# Altium PCB InterfaceBoard_MPCB.PcbDoc (part 2 of 3)
Units mil, origin at the board's own origin, x right, y up, seen from the top; angles counter-clockwise.
Board outline 1629.92 x 1653.54 mil, 4 copper layers (Top Layer, Power, Ground, Bottom Layer), stack 61.899 mil thick; 94 components, 58 nets, 296 pads, 186 vias.
Unrouted connection lines stored in the file: 1.
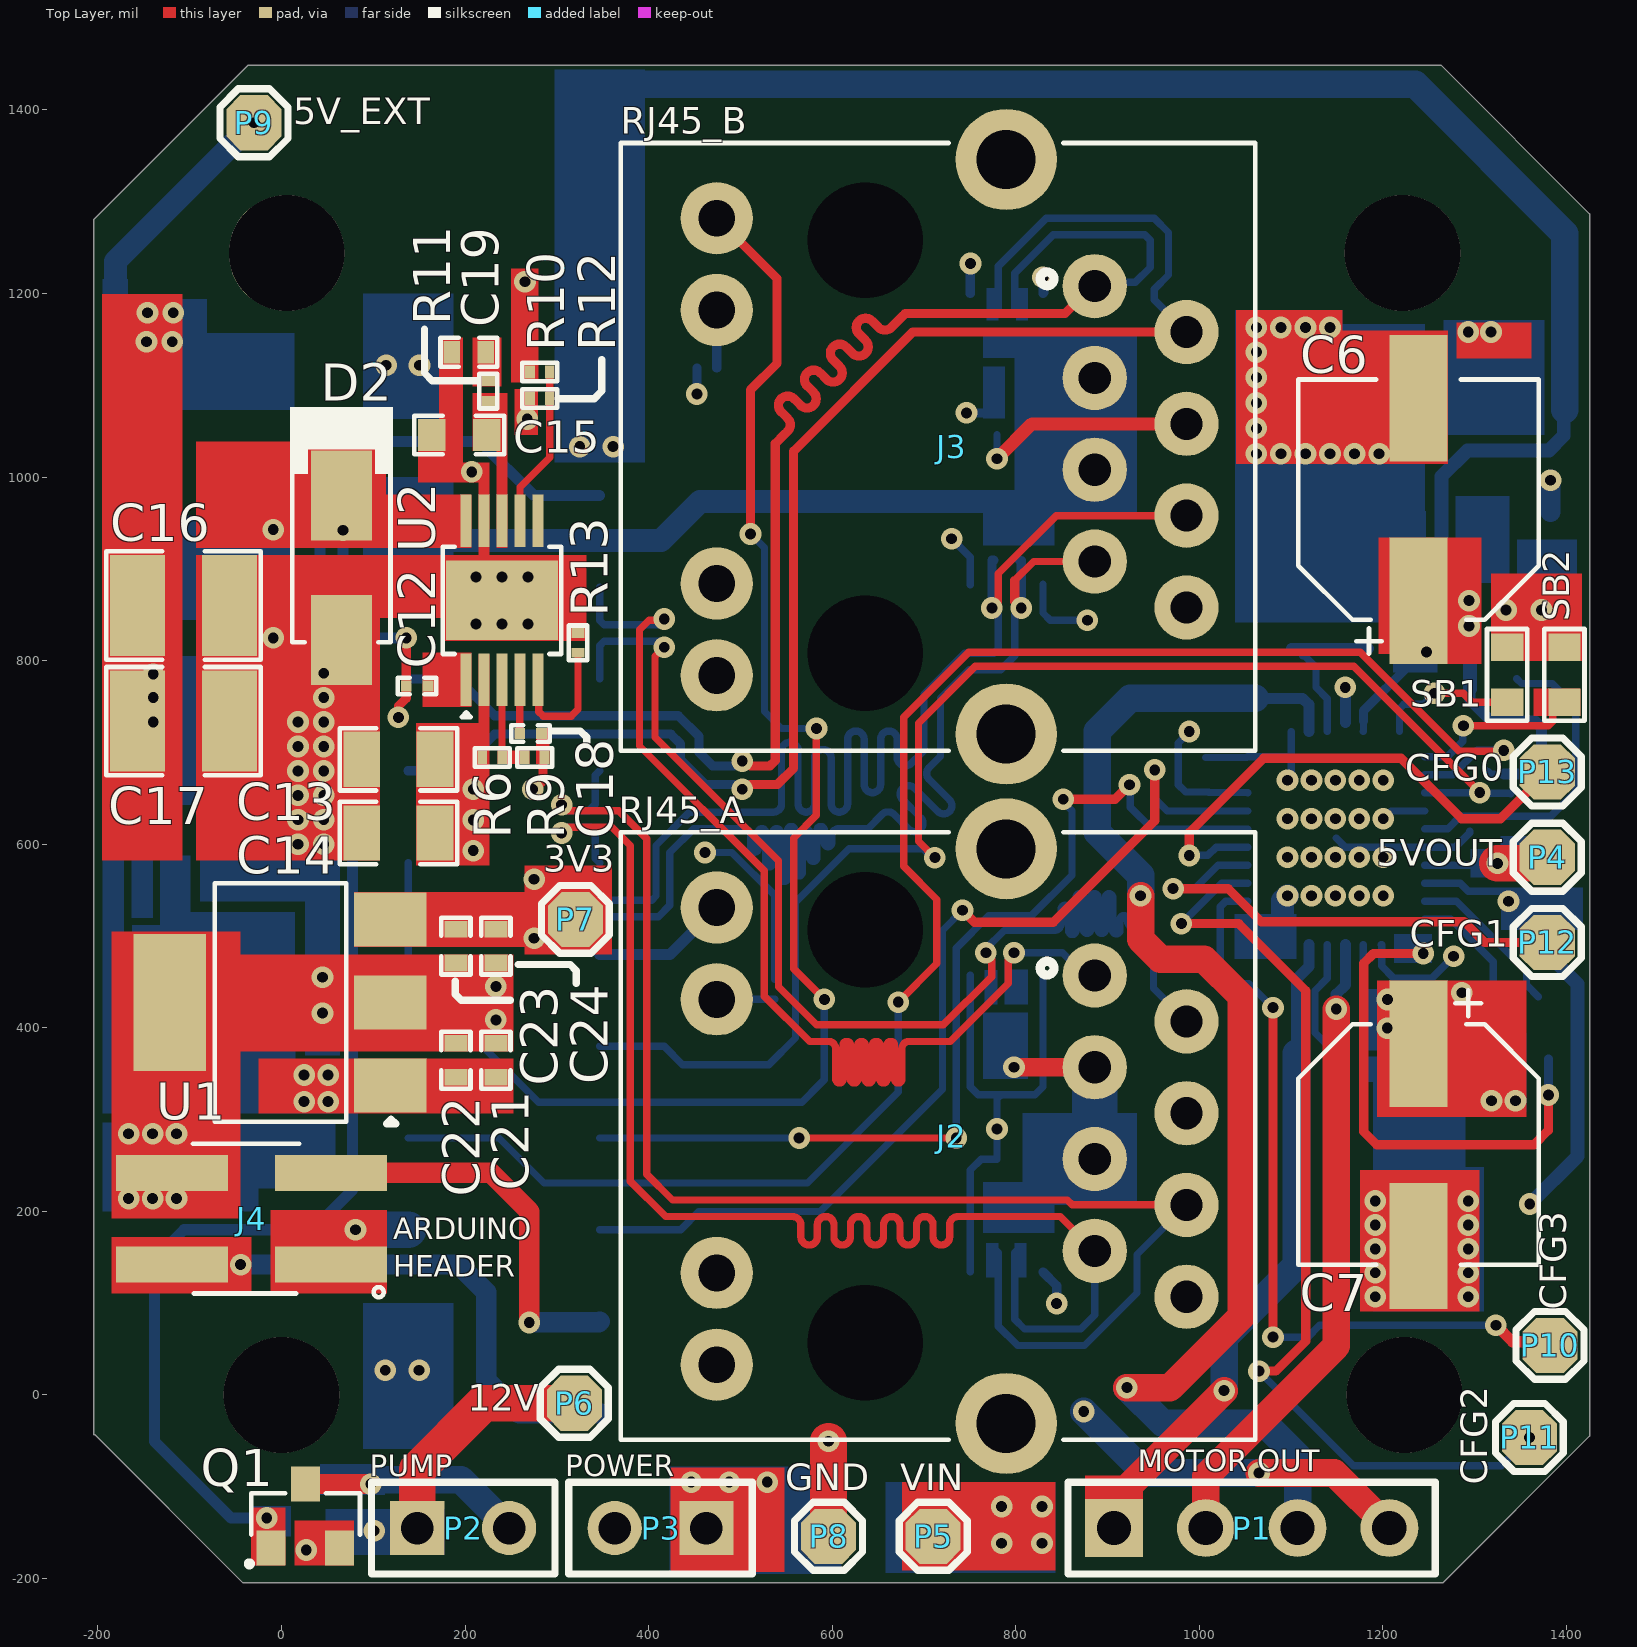
[diagram p0: Top Layer view]

## Part data (continued)
R7: library part RT0603BRD0720KL, "RES SMD 20K OHM 0.1% 1/10W 0603", Case Code (Imperial)=0603, Case Code (Metric)=1608, LCSC Part Number=C723637, Manufacturer=Yageo, Max Operating Temperature=125°C, Max Power Dissipation=100mW, Min Operating Temperature=-55°C, Package Quantity=5000, Resistance=20kR, Resistor Type="Thin Film", Temperature Coefficient=25ppm/°C, Tolerance=0.1%, Voltage Rating=75V, Voltage Rating (DC)=50V, Case/Package=0603, Category="Chip SMD Resistors", ComponentLink1Description=https://datasheet.ciiva.com/2585/pyu-rt-1-to-0-05-rohs-l-4-2585771.pdf?src-supplier=Digi-Key, ComponentLink1URL=https://datasheet.ciiva.com/2585/pyu-rt-1-to-0-05-rohs-l-4-2585771.pdf?src-supplier=Digi-Key, ComponentLink2Description=https://datasheet.ciiva.com/46634/pyu-rt-1-to-0-05-rohs-l-5-46634970.pdf?src-supplier=Digi-Key, ComponentLink2URL=https://datasheet.ciiva.com/46634/pyu-rt-1-to-0-05-rohs-l-5-46634970.pdf?src-supplier=Digi-Key, Construction=Rectangular, Contact Plating=Tin,Lead, Depth=0.8mm, Features="Moisture Resistant", Height=0.022inch, Item Type=Resistor, Lead Free="Lead Free", Length=1.6mm, Manufacturer Part Number=RT0603BRD0720KL, Military Standard=Not, Number of Terminations=2, Packaging="Tape and Reel", Power Rating=100mW, Pricing 1="5000=0.04300, 10000=0.03130, 25000=0.02970, 50000=0.02940, 125000=0.02040 (USD)", RoHS=Yes, RoHS Compliant=Yes, Series=RT, Size Code=0603, Stock 1=190000, Supplier 1="Arrow Electronics", Supplier Part Number 1=RT0603BRD0720KL, Termination=SMD/SMT, Weight=7.1E-05oz, Width=0.8mm
R8: library part VG039NCHXTB203, "±25% 20kΩ SMD Variable Resistors/Potentiometers ROHS", LCSC Part Number=C128550, Manufacturer="HDK(Hokuriku Elec Industry)", Package=SMD, ComponentLink1Description=LCSC, ComponentLink1URL=https://www.lcsc.com/product-detail/Variable-Resistors-Potentiometers_HDK-Hokuriku-Elec-Industry-VG039NCHXTB203_C128550.html, Item Type=Potentiometer, Manufacturer Part Number=VG039NCHXTB203
R9: library part 0201WMF7871TEE, "50mW Thick Film Resistors ±1% 7.87kΩ 0201 Chip Resistor - Surface Mount ROHS", LCSC Part Number=C473937, Manufacturer="UNI-ROYAL(Uniroyal Elec)", Package=0201, ComponentLink1Description=LCSC, ComponentLink1URL=https://www.lcsc.com/product-detail/Chip-span-style-background-color-ff0-Resistor-span-Surface-Mount_UNI-ROYAL-Uniroyal-Elec-0201WMF7871TEE_C473937.html, Item Type=Resistor, Manufacturer Part Number=0201WMF7871TEE
R10: library part WR02X1403FAL, "Res 140K Ohm 1% 1/20W 0201", LCSC Part Number=C367500, Manufacturer="Walsin Technologies", Supplier Part Number 1=1292-WR02X1403FALTR-ND, Category="Chip SMD Resistors", Item Type=Resistor, Manufacturer Part Number=WR02X1403FAL, Pricing 1="15000=0.00192 (USD)", RoHS=Yes, RoHS Compliant=Yes, Supplier 1=Digi-Key
R12 R22: library part RC0201JR-0710KL, "RES SMD 10K OHM 5% 1/20W 0201", Case Code (Imperial)=0201, Case Code (Metric)=0603, LCSC Part Number=C138117, Manufacturer=Yageo, Max Operating Temperature=125°C, Min Operating Temperature=-55°C, Power Rating=50mW, Resistance=10kR, Resistor Type="Thick Film", Supplier Part Number 1=311-10KNCT-ND, Temperature Coefficient=200ppm/°C, Tolerance=5%, Voltage Rating=25V, Case/Package=0201, Category="Chip SMD Resistors", ComponentLink1Description="New link", ComponentLink2Description=https://datasheet.ciiva.com/8891/pyu-rc0201-51-rohs-l-8-8891388.pdf?src-supplier=Avnet, ComponentLink2URL=https://datasheet.ciiva.com/8891/pyu-rc0201-51-rohs-l-8-8891388.pdf?src-supplier=Avnet, ComponentLink3Description=https://datasheet.ciiva.com/7672/1563626-7672253.pdf?src-supplier=Element14, ComponentLink3URL=https://datasheet.ciiva.com/7672/1563626-7672253.pdf?src-supplier=Element14, ComponentLink4Description=https://datasheet.ciiva.com/28405/pyu-rc0201-51-rohs-l-8-28405613.pdf?src-supplier=Avnet+Europe, ComponentLink4URL=https://datasheet.ciiva.com/28405/pyu-rc0201-51-rohs-l-8-28405613.pdf?src-supplier=Avnet+Europe, ComponentLink5Description=https://datasheet.ciiva.com/7672/1563626-7672254.pdf?src-supplier=Element14, ComponentLink5URL=https://datasheet.ciiva.com/7672/1563626-7672254.pdf?src-supplier=Element14, ComponentLink6Description=https://datasheet.ciiva.com/7660/1421516-7660810.pdf?src-supplier=Element14, ComponentLink6URL=https://datasheet.ciiva.com/7660/1421516-7660810.pdf?src-supplier=Element14, ComponentLink7Description=https://datasheet.ciiva.com/16856/pyu-rc0201-51-rohs-l-8-16856011.pdf?src-supplier=Avnet+Europe, ComponentLink7URL=https://datasheet.ciiva.com/16856/pyu-rc0201-51-rohs-l-8-16856011.pdf?src-supplier=Avnet+Europe, ComponentLink8Description=https://datasheet.ciiva.com/46391/1421516-46391291.pdf?src-supplier=Element14, ComponentLink8URL=https://datasheet.ciiva.com/46391/1421516-46391291.pdf?src-supplier=Element14, Contact Plating=Tin,Matte, Depth=0.3mm, Lead Free="Lead Free", Length=0.6mm, Manufacturer Part Number=RC0201JR-0710KL, Military Standard=Not, Packaging="Tape and Reel", Pricing 1="1=0.10000, 10=0.02600, 100=0.01050, 1000=0.00472, 2500=0.00410, 5000=0.00338 (USD)", Radiation Hardening=No, REACH SVHC=Unknown, RoHS=Yes, Stock 1=1488597, Supplier 1=Digi-Key, Termination=SMD/SMT, Voltage Rating (DC)=25V
R13: library part 0201WMF6813TEE, "50mW Thick Film Resistors ±1% 681kΩ 0201 Chip Resistor - Surface Mount ROHS", LCSC Part Number=C423447, Manufacturer="UNI-ROYAL(Uniroyal Elec)", Package=0201, ComponentLink1Description=LCSC, ComponentLink1URL=https://www.lcsc.com/product-detail/Chip-span-style-background-color-ff0-Resistor-span-Surface-Mount_UNI-ROYAL-Uniroyal-Elec-0201WMF6813TEE_C423447.html, Item Type=Resistor, Manufacturer Part Number=0201WMF6813TEE
R14 R15 R16 R17 R18 R19 R20 R21: library part RC0201FR-0749R9L, "RES SMD 49.9 OHM 1% 1/20W 0201", Case Code (Imperial)=0201, Case Code (Metric)=0603, LCSC Part Number=C155744, Manufacturer=Yageo, Max Operating Temperature=125°C, Max Power Dissipation=50mW, Min Operating Temperature=-55°C, Resistor Type="Thick Film", Temperature Coefficient=200ppm/°C, Tolerance=1%, Voltage Rating=25V, Case/Package=0201, Category="Chip SMD Resistors", ComponentLink1Description=http://www.yageo.com/documents/recent/PYu-RC0201_51_RoHS_L_(8).pdf?src-supplier=Mouser, ComponentLink1URL=http://www.yageo.com/documents/recent/PYu-RC0201_51_RoHS_L_(8).pdf?src-supplier=Mouser, ComponentLink2Description=http://www.yageo.com/documents/recent/PYu-RC0201_51_RoHS_L_(8).pdf?src-supplier=Future+Electronics, ComponentLink2URL=http://www.yageo.com/documents/recent/PYu-RC0201_51_RoHS_L_(8).pdf?src-supplier=Future+Electronics, ComponentLink3Description=http://www.yageo.com/documents/recent/PYu-RC_Group_51_RoHS_L_10.pdf?src-supplier=Digi-Key, ComponentLink3URL=http://www.yageo.com/documents/recent/PYu-RC_Group_51_RoHS_L_10.pdf?src-supplier=Digi-Key, ComponentLink4Description=http://www.yageo.com/documents/recent/PYu-RC_Group_51_RoHS_L_9.pdf?src-supplier=Digi-Key, ComponentLink4URL=http://www.yageo.com/documents/recent/PYu-RC_Group_51_RoHS_L_9.pdf?src-supplier=Digi-Key, Construction=Rectangular, Depth=0.3mm, Features="Moisture Resistant", Height=0.01inch, Item Type=Resistor, Lead Free="Lead Free", Length=0.6mm, Manufacturer Part Number=RC0201FR-0749R9L, Military Standard=Not, Number of Terminations=2, Packaging="Tape and Reel", Power Rating=50mW, Pricing 1="10000=0.00128 (USD)", Resistance=49.9R, RoHS=Yes, RoHS Compliant=Yes, Series=RC, Size Code=0201, Stock 1=1020000, Supplier 1=Avnet, Supplier Part Number 1=RC0201FR-0749R9L, Termination=SMD/SMT, Width=0.012inch
R33 R39: library part RC0201DR-07330RL, "RES 330 OHM 0.5% 1/20W 0201", Case/Package=0201, LCSC Part Number=C851717, Manufacturer=Yageo, Max Operating Temperature=125°C, Max Power Dissipation=50mW, Min Operating Temperature=-55°C, Supplier Part Number 1=RC0201DR-07330RL-ND, Temperature Coefficient=200ppm/°C, Tolerance=0.5%, Category="Chip SMD Resistors", ComponentLink1Description=http://www.yageo.com.tw/exep/pages/download/literatures/PYu-R_INT-thick_7.pdf?src-supplier=Digi-Key, ComponentLink1URL=http://www.yageo.com.tw/exep/pages/download/literatures/PYu-R_INT-thick_7.pdf?src-supplier=Digi-Key, Features="Moisture Resistant", Height=0.01inch, Item Type=Resistor, Length=0.024inch, Manufacturer Part Number=RC0201DR-07330RL, Number of Terminations=2, Packaging="Tape and Reel", Pricing 1="10000=0.02267 (USD)", RoHS=Yes, RoHS Compliant=Yes, Series=RC, Supplier 1=Digi-Key, Width=0.012inch
SB1 SB2: "Solder Bridge ON"
U1: "70dB@(100Hz) 1.5A Fixed 3.3V~3.3V Positive 6V SOT-223 Linear Voltage Regulators (LDO) ROHS", LCSC Part Number=C401677, Manufacturer="BL(Shanghai Belling)", Package=SOT-223, ComponentLink1Description=LCSC, ComponentLink1URL=https://www.lcsc.com/product-detail/Linear-Voltage-Regulators-LDO_BL-Shanghai-Belling-BL8071CLATR33_C401677.html, Item Type=IC, Manufacturer Part Number=BL8071CLATR33
U2: "IC REG BCK SPLIT RAIL ADJ 10MSOP", Case/Package=HVSSOP, LCSC Part Number=C53213, Manufacturer="Texas Instruments", Max Operating Temperature=125°C, Max Output Current=2.5A, Max Output Voltage=39V, Max Supply Voltage=42V, Min Input Voltage=3.5V, Min Operating Temperature=-40°C, Min Output Voltage=800mV, Package Quantity=1, Quiescent Current=138uA, Supplier Part Number 1=296-27414-1-ND, Switching Frequency=2.5MHz, Category="Voltage Regulators - Switching", ComponentLink1Description=https://datasheet.ciiva.com/2026/tps54240-2026016.pdf?src-supplier=Digi-Key, ComponentLink1URL=https://datasheet.ciiva.com/2026/tps54240-2026016.pdf?src-supplier=Digi-Key, ComponentLink2Description=https://datasheet.ciiva.com/41462/001014834-da-01-en-ic-reg-buck-ad-tps54240dgqr-vssop-10-tid-41462681.pdf?src-supplier=Conrad, ComponentLink2URL=https://datasheet.ciiva.com/41462/001014834-da-01-en-ic-reg-buck-ad-tps54240dgqr-vssop-10-tid-41462681.pdf?src-supplier=Conrad, ComponentLink3Description=https://datasheet.ciiva.com/2026/tps54240-2026015.pdf?src-supplier=Digi-Key, ComponentLink3URL=https://datasheet.ciiva.com/2026/tps54240-2026015.pdf?src-supplier=Digi-Key, ComponentLink4Description=https://datasheet.ciiva.com/2026/tps54240-2026014.pdf?src-supplier=Digi-Key, ComponentLink4URL=https://datasheet.ciiva.com/2026/tps54240-2026014.pdf?src-supplier=Digi-Key, ComponentLink5Description=https://datasheet.ciiva.com/14378/slvsaa6-14378059.pdf?src-supplier=Avnet, ComponentLink5URL=https://datasheet.ciiva.com/14378/slvsaa6-14378059.pdf?src-supplier=Avnet, Contact Plating=Gold, Height=0.95mm, Item Type=IC, Lead Free="Lead Free", Length=3.1mm, Manufacturer Part Number=TPS54240DGQR, Min Supply Voltage=3.5V, Number of Outputs=1, Operating Supply Voltage=42V, Output Current=2.5A, Output Type=Adjustable, Output Voltage=39V, Packaging="Tape and Reel", Pins=10, Pricing 1="1=3.26000, 10=2.93100, 25=2.77120, 100=2.40190, 250=2.27868, 500=2.04466, 1000=1.74300 (USD)", Radiation Hardening=No, Reach SVHC Compliant=Yes, RoHS=Yes, RoHS Compliant=Yes, Series="SWIFT™, Eco-Mode™", Supplier 1=Digi-Key, Synchronous Rectifier=No, Topology=Buck-Boost, Width=3.1mm
U3: "IC STEPPER MOTOR DVR SPI 36QFN", Case/Package=QFN, Manufacturer=Trinamic, Max Operating Temperature=125°C, Min Operating Temperature=-40°C, Output Current=1.4A, Supplier Part Number 1=700-TMC2130-LA-T, Category="Motor Drivers", ComponentLink1Description=https://www.trinamic.com/fileadmin/assets/Products/ICs_Documents/TMC2130_datasheet.pdf?src-supplier=Digi-Key, ComponentLink1URL=https://www.trinamic.com/fileadmin/assets/Products/ICs_Documents/TMC2130_datasheet.pdf?src-supplier=Digi-Key, Interface=SPI, Logic Function="AND GATE", Manufacturer Part Number=TMC2130-LA-T, Mount="Surface Mount", Packaging="Tape and Reel", Pricing 1="1=5.61000, 10=4.76000, 50=4.76000, 100=4.01000, 250=3.70000, 500=3.45000, 1000=2.90000, 2000=2.83000, 10000=2.83000 (USD)", RoHS=Yes, Stock 1=19660, Supplier 1=Mouser
U4: "IC REG BUCK 5V 2A TSOT26", LCSC Part Number=C2071056, Manufacturer=Diodes, Supplier Part Number 1=AP63205WU-7DICT-ND, Category="Voltage Regulators - Switching", Item Type=IC, Manufacturer Part Number=AP63205WU-7, Pricing 1="1=0.88, 10=0.776, 25=0.7292, 100=0.5952, 250=0.55284, 500=0.4705, 1000=0.3764 (USD)", RoHS=Yes, Stock 1=88525, Supplier 1=Digi-Key

## Free pads (board coordinates)
  round 125.98 hole 125.98 mask+1.97: MH(0,0) MH(5.62,1244.09) MH(1221.29,1244.09) MH(1223.46,0)

## Via types
v1: diameter 23.62, hole 11.81, Top Layer to Bottom Layer, 186 vias

## Nets (pads, with @x,y where several pads share a name; then routed paths per layer and width w, separated by ;. In a path a pad name is that pad's centre, name@x,y a point inside that pad or via, vN(x,y) a via of type N, cw(c..) or ccw(c..) an arc to the next point about the centre after c; other vN are vias at no path point)
5V_EXT: C2.2 C21.2 C22.2 C27.2 C28.2 C29.2 L1.2 P9.1 R2.1 R7.2 U1.1 U3.26 U3.30 U4.1 | length 1035.6
  Top Layer w8: v1(1277,478) v1@1279.99,480.99
  Top Layer w25: -11.38,347.61 107.87,347.61 U1.1@118.45,337.03 ; 208,338 C21.2@233.54,338
  Bottom Layer w8: U4.1@-157.63,656.28 U4.1@-151.59,662.32 ; U3.30@1198.35,490.58 1198.55,490.37 1198.55,467.38 1211.83,454.11 1253.11,454.11 v1(1277,478) ; U3.26@1245.59,557.5 1284.12,557.5 1292.81,548.82 1353.82,548.82 1373.07,529.57 ; R2.1@1342.71,529.57 1336.86,535.42 v1(1336.86,537.82) 1336.86,528.76 1349.12,516.5 R2.1@1349.12,515.5 ; 1371.23,548.07 1388.9,548.07
  Bottom Layer w22: R7.2@1382.64,962 v1(1382.64,996.64) v1@1383,997
  Bottom Layer w25: -182.5,669.51 -175.31,662.32 ; -181.08,942.75 -181.08,1234.92 v1(-30,1386)
  other v1: 24.71,319.58 50.79,319.58 24.71,348.61 50.79,348.61
5VOUT: C1.2 P4.1 R2.2 U3.25 | length 129.1
  Top Layer w40: v1(1324.88,579.14) 1372.28,579.14 P4.1@1379,585.85
  Bottom Layer w8: U3.25@1245.59,577.19 C1.2@1307.75,577.19 ; v1(1324.88,579.14) 1327.02,577 R2.2@1334,577
#UART_RX: J1.25 J4.2 | length 594.2
  Top Layer w22: J4.2@-124.24,142 v1(-44.54,142)
  Bottom Layer w22: v1(-44.54,142) 193,142 223,112 223,16.08 259.08,-20 J1.25@346.65,-20
#UART_TX: J1.23 J4.3 | length 436.5
  Top Layer w22: J4.3@48.99,242 228,242 270,200 v1(270,79)
  Bottom Layer w22: v1(270,79) 270.31,79.31 345.97,79.31 J1.23@346.65,80
BOOT: C12.1 U2.1
CFG0: P13.1 U3.5 | length 564.4
  Top Layer w10: v1(988.96,587.83) 988.96,612.71 1069.96,693.71 1219.74,693.71 1285.68,627.77 1328.06,627.77 P13.1@1379,678.71
  Bottom Layer w8: v1(988.96,587.83) 1009.18,587.83 1018.23,596.87 U3.5@1052.68,596.87
CFG1: P12.1 U3.4 | length 523.7
  Top Layer w10: v1(971.44,551.6) 1031.39,551.6 1067.49,515.5 1288.5,515.5 1311,493 P12.1@1379,493
  Bottom Layer w8: v1(971.44,551.6) 994.75,551.6 1020.34,577.19 U3.4@1052.68,577.19
CFG2: P11.1 U3.3 | length 1052.6
  Top Layer w10: v1(980.37,513.48) 1042.94,513.48 1116,440.42 1116,58.69 1083.31,26 v1(1065,26)
  Bottom Layer w8: v1(980.37,513.48) 1024.39,557.5 U3.3@1052.68,557.5 ; v1(1065,26) 1168,-77 1328.74,-77 v1(1359.5,-46.24)
CFG3: P10.1 U3.2 | length 856.1
  Top Layer w8: v1@1083.19,66.03 v1@1086.21,63.01
  Top Layer w10: v1(1080.15,62.99) v1(1080.15,421.94)
  Top Layer w12: v1(1323,76) 1341.03,57.97 1378.03,57.97 P10.1@1382,54
  Bottom Layer w8: U3.2@1052.68,537.82 1028.64,537.82 1022.74,531.91 1022.74,461.7 1036.45,447.98 1054.11,447.98 v1(1080.15,421.94) ; v1(1080.15,62.99) 1117.95,62.99 1130.95,76 v1(1323,76)
COMP: C15.2 R11.2 U2.8
DIAG0: J1.20 R1.2 U3.20 | length 1866.9
  Top Layer w8: v1(672,428) 714,470 714,539.86 678,575.86 678,738.21 748.79,809 1175.44,809 1283.23,701.21 1336.61,701.21 v1@1337.64,702.24
  Bottom Layer w8: J1.20@137.99,280 237,280 286,231 573,231 672,330 v1(672,428) ; U3.20@1245.59,675.61 1276.22,675.61 1302.84,702.24 R1.2@1311.75,702.24 v1(1331.64,702.24)
DIAG1: J1.17 R5.2 U3.21 | length 1502.2
  Top Layer w8: v1(711.83,585.41) 693.99,603.26 693.99,731.99 756,794 1168.37,794 v1@1304.47,657.89
  Bottom Layer w8: J1.17@346.65,380 416.85,380 436.93,359.92 531.02,359.92 560,388.9 560,536.76 618.21,594.98 699.34,594.98 708.9,585.41 v1(711.83,585.41) ; U3.21@1245.59,655.93 1245.73,656.07 1297.33,656.07 1297.47,656.21 1298.11,655.57 1338.5,655.57 R5.2@1339.14,654.93
  other v1: 1305.47,656.21
DIR: J1.21 U3.7 | length 1094.9
  Top Layer w10: v1(742,528) 755,515 840.75,515 951.41,625.66 v1(951.41,681.04)
  Bottom Layer w8: J1.21@346.65,180 434.81,180 454.74,199.93 586.83,199.93 720.09,333.19 720.09,506.09 v1(742,528) ; v1(951.41,681.04) 951.41,649.88 965.05,636.24 U3.7@1052.68,636.24
EN/TPS: R6.1 R9.2 U2.3 | length 83.5
  Top Layer w8: U2.3@240.24,778.01 240.32,777.93 240.32,694.65 R6.1@240.39,694.58
GND: C1.1 C2.1 C3.1 C4.2 C5.2 C6.2 C7.2 C9.1 C11.1 C13.1 C14.1 C15.1 C16.1 C17.1 C18.1 C19.1 C21.1 C22.1 C23.1 C24.1 C25.1 C26.1 C27.1 C28.1 C29.1 C30.2 C31.2 C32.2 C33.2 C34.2 C35.2 C36.2 C37.2 C38.2 C39.2 C40.2 D1.1 D2.2 J1.24 J1.26 J4.4 P3.2 P8.1 Q1.2 R3.2 R4.2 R8.3 R9.1 R12.1 R13.1 R22.2 R33.1 R39.1 SB1.2 SB2.2 U1.2 U1.4 U2.9 U2.11 U3.1 U3.10 U3.12 U3.22 U3.24 U3.35 U3.36 U3.37 U4.4 | length 2155.3
  Top Layer w8: C15.1@177.61,1045.71 177.61,1003.69 182.3,999 ; U2.11@204.81,888.24 U2.11@220.56,903.99 ; v1@267.69,1063.21 v1(267.7,1063.31)
  Top Layer w10: v1(273.71,659.92) 275.83,659.92 284.74,668.84 284.74,692.66 R9.1@286.65,694.57
  Top Layer w25: v1@46,412 61.58,427.58 U1.2@86.45,427.58 ; P8.1@596,-158 P8.1@596,-154
  Top Layer w40: P8.1@596,-154 v1(596,-50.47)
  Bottom Layer w8: R22.2@26.83,-147 26.91,-147.09 26.91,-168.91 v1(27,-169) ; v1(461.37,590.98) 490.61,590.98 537.35,544.24 R33.1@537.35,452.65 ; v1(730.09,932.78) 750.39,912.48 C35.2@750.39,882.78 ; C34.2@750.39,134.01 750.39,245.17 762.2,256.98 C38.2@779.5,256.98 v1(779.5,289.68) 779.5,322.37 784.19,327.06 ; C32.2@750.39,457.28 750.39,335.76 759.1,327.06 784.19,327.06 ; C30.2@829.63,457.28 829.63,335.76 820.92,327.06 784.19,327.06 ; C37.2@829.63,883.23 829.63,851.85 837.47,844 v1(878,844) ; C3.1@1006.96,694.58 1051.96,694.58 U3.10@1052.68,695.3 1096.98,695.3 1099.92,698.24 ; v1(1096.02,669.71) 1099.92,673.61 1099.92,698.24 ; U3.12@1099.92,722.86 1099.92,698.24 ; U3.37@1149.13,606.72 1158.98,596.87 U3.24@1245.59,596.87 1278.93,596.87 1294.75,612.69 C1.1@1294.75,614.19 ; v1(1200.35,627.77) 1208.82,636.24 U3.22@1245.59,636.24 ; R3.2@1251.41,282.25 R3.2@1266.66,267
  Bottom Layer w10: R39.1@452.53,1119 v1(452.53,1090.47) v1@453,1090 ; v1@746.3,1069.82 C40.2@779.5,1069.82 ; C33.2@750.39,1200.04 750.48,1200.13 750.48,1232.7 v1(750.56,1232.78) ; C31.2@829.53,1200.95 v1@829.53,1213.72 ; C36.2@829.63,134.01 844.65,118.98 v1@844.65,99.91 ; C31.2@829.63,1200.05 C31.2@830.53,1200.95
  Bottom Layer w15: v1(1360,208) 1412,260 1412,447.8 1390.4,469.41 C2.1@1390.4,485.82
  Bottom Layer w20: v1@118.47,21 118.47,24.47 v1@121,27
  Bottom Layer w22: 1392.01,855.23 R8.3@1392.01,908.41
  Bottom Layer w25: J1.26@137.99,-20 J1.26@167.13,-20 ; P3.2@356.48,-138.48 P3.2@362.99,-145 ; 1067.49,492.02 1078.79,492.02 U3.36@1080.24,490.58 1089.49,490.58 ; 1090.77,510.95 1090.77,538.64 v1(1096.02,543.88)
  other v1: 113,27 149.99,27 844.49,99.74 1191.68,107 1293,107 1191.68,133.08 1293,133.08 1191.68,159.17 1293,159.17 1191.68,185.25 1293,185.25 1191.68,211.33 1293,211.33 -166.5,214 -140.42,214 -114.33,214 -166.5,284.58 -140.42,284.58 -114.33,284.58 233.54,408.69 44.62,416 233.54,445 44.62,455.17 1122.1,543.88 1148.18,543.88 1174.26,543.88 1200.35,543.88 1096.02,585.83 1122.1,585.83 1148.18,585.83 1174.26,585.83 1200.35,585.83 18,600 46,600 18,626.62 46,626.62 1096.02,627.77 1122.1,627.77 1148.18,627.77 1174.26,627.77 18,653.24 46,653.24 1122.1,669.71 1148.18,669.71 1174.26,669.71 1200.35,669.71 18,679.86 46,679.86 18,706.48 46,706.48 18,733.1 46,733.1 46,759.72 46,786.34 -9,824.83 1334,855.23 1372.76,855.23 207.24,1005.69 1062.09,1025.42 1088.84,1025.42 1115.59,1025.42 1142.34,1025.42 1169.09,1025.42 1195.85,1025.42 1062.09,1053.11 746.3,1069.99 1062.09,1080.79 1062.09,1108.48 1062.09,1136.16 1062.09,1162.92 1088.84,1162.92 1115.59,1162.92 1142.34,1162.92 829.53,1217.72
GND_ETH: "J2.Shield 1" "J2.Shield 2" "J3.Shield 1" "J3.Shield 2" C40.1 J2.4 J2.8 J3.4 J3.8 | length 312.7
  Top Layer w14: v1(779.5,1020.01) 817.5,1058.01 J3.4@985.99,1058.01
  Top Layer w40: 789.54,-31.01 801.7,-18.84
  Top Layer w50: J2.4@985.99,301.79 J2.4@985.99,306.98
  Bottom Layer w8: v1(779.5,1020.01) C40.1@779.5,1046.2 ; 789.54,585.2 789.54,594.98
  Bottom Layer w50: 789.54,720.02 797.55,712 808.41,722.86 ; J3.8@985.99,852.57 J3.8@985.99,858.01
LINK0: J1.15 J2.9 | length 148.7
  Bottom Layer w12: J1.15@346.65,480 423.18,480 J2.9@474.18,531
LINK1: J1.18 J3.9 | length 1542.8
  Top Layer w8: v1(582.79,726.04) 582.79,631.59 558,606.81 558,464.45 v1(591.45,431)
  Top Layer w10: J3.9@474.18,1282.02 540,1216.21 540,1124 511,1095 v1(511,938)
  Bottom Layer w8: J1.18@137.99,380 219,380 280,319 567,319 587.08,339.08 591.45,343.45 v1(591.45,431) ; v1(511,938) 526.17,922.83 526.17,744.66 544.79,726.04 v1(582.79,726.04)
MOTOR_A1: P1.1 U3.34 | length 722.4
  Top Layer w30: P1.1@906.99,-145 923.49,-128.5 923.49,-98.78 v1(1026.98,4.71)
  Bottom Layer w12: 1105.83,372.16 1105.83,453.14 1119.51,466.82 1119.51,490.48 U3.34@1119.61,490.58
  Bottom Layer w30: v1@1026.98,6 1026.98,62.62 1105.83,141.47 1105.83,372.16
MOTOR_A2: P1.2 U3.32 | length 698.5
  Top Layer w30: P1.2@1006.99,-145 1006.99,-88.78 1149.13,53.36 v1(1149.13,420.46)
  Bottom Layer w12: v1(1149.13,420.46) 1149.13,436.56 1158.98,446.4 U3.32@1158.98,490.58
MOTOR_B1: P1.3 U3.13 | length 1459.3
  Top Layer w30: v1(921.03,7.97) 967.96,7.97 1045.49,85.49 1045.49,434.33 1005.05,474.76 957.68,474.76 935.93,496.51 v1(935.93,543.88)
  Bottom Layer w12: 1061.09,758.99 1112.58,758.99 1119.61,751.96 U3.13@1119.61,722.86
  Bottom Layer w30: v1(921.03,7.97) 960.01,-31.01 1071.01,-31.01 1106.99,-66.99 P1.3@1106.99,-145 ; v1(935.93,543.88) 935.93,566.26 888.95,613.24 888.95,723.06 924.89,758.99 1061.09,758.99
MOTOR_B2: P1.4 U3.15 | length 425
  Top Layer w22: P1.4@1205.11,-145 P1.4@1206.99,-145
  Top Layer w30: v1(1065,-85) 1146.99,-85 1205.11,-143.11 P1.4@1205.11,-145
  Bottom Layer w12: U3.15@1158.98,732.61 v1(1158.98,770.87)
  Bottom Layer w30: v1(874,-18) 941,-85 v1(1065,-85)
NetC8_1: C8.1 U3.27 | length 175.3
  Bottom Layer w8: U3.27@1245.59,537.82 1280.18,537.82 1356.38,461.62 1356.38,446.82 C8.1@1369.24,433.96
NetC8_2: C8.2 U3.28 | length 145.4
  Bottom Layer w8: U3.28@1245.59,518.13 1274.22,518.13 1320.24,472.11 1320.24,454.11 1320.24,446.4 C8.2@1320.24,420.46
NetC9_2: C9.2 R3.1 U3.33 | length 238.8
  Bottom Layer w8: U3.33@1139.29,490.58 1139.29,453.89 1125.9,440.5 1125.9,394.56 1147.16,373.3 1147.16,269.18 R3.1@1149.34,267
NetC10_1: C10.1 U3.29 | length 578.7
  Top Layer w10: v1(1244,481) 1189.65,481 1179,470.35 1179,286.88 1193.34,272.53 1364.53,272.53 1380.24,288.24 v1(1380.24,326.76)
  Bottom Layer w8: U3.29@1218.03,490.58 1218.03,482.91 1219.94,481 v1(1244,481)
  Bottom Layer w10: v1(1380.24,326.76) C10.1@1380.24,365.98
NetC11_2: C11.2 R4.1 U3.14 | length 181.1
  Bottom Layer w8: R4.1@1098.39,811.36 R4.1@1100.39,813.36 ; R4.1@1112.7,805.36 1114.57,805.36 1127.01,792.92 1127.01,770.87 1139.29,758.59 U3.14@1139.29,722.86
  Bottom Layer w12: R4.1@1100.39,813.36 C11.2@1184,813.36
NetC19_2: C19.2 R11.1
NetC20_1: C20.1 U4.6
NetC20_2: C20.2 L1.1 U4.5